# Altium PCB DC-DC_Bridge.PcbDoc
Units mm, origin at the board's own origin, x right, y up, seen from the top; angles counter-clockwise.
Board outline 75 x 80 mm, 2 copper layers (Top Layer, Bottom Layer), stack 0.871 mm thick; 101 components, 43 nets, 233 pads, 26 vias.
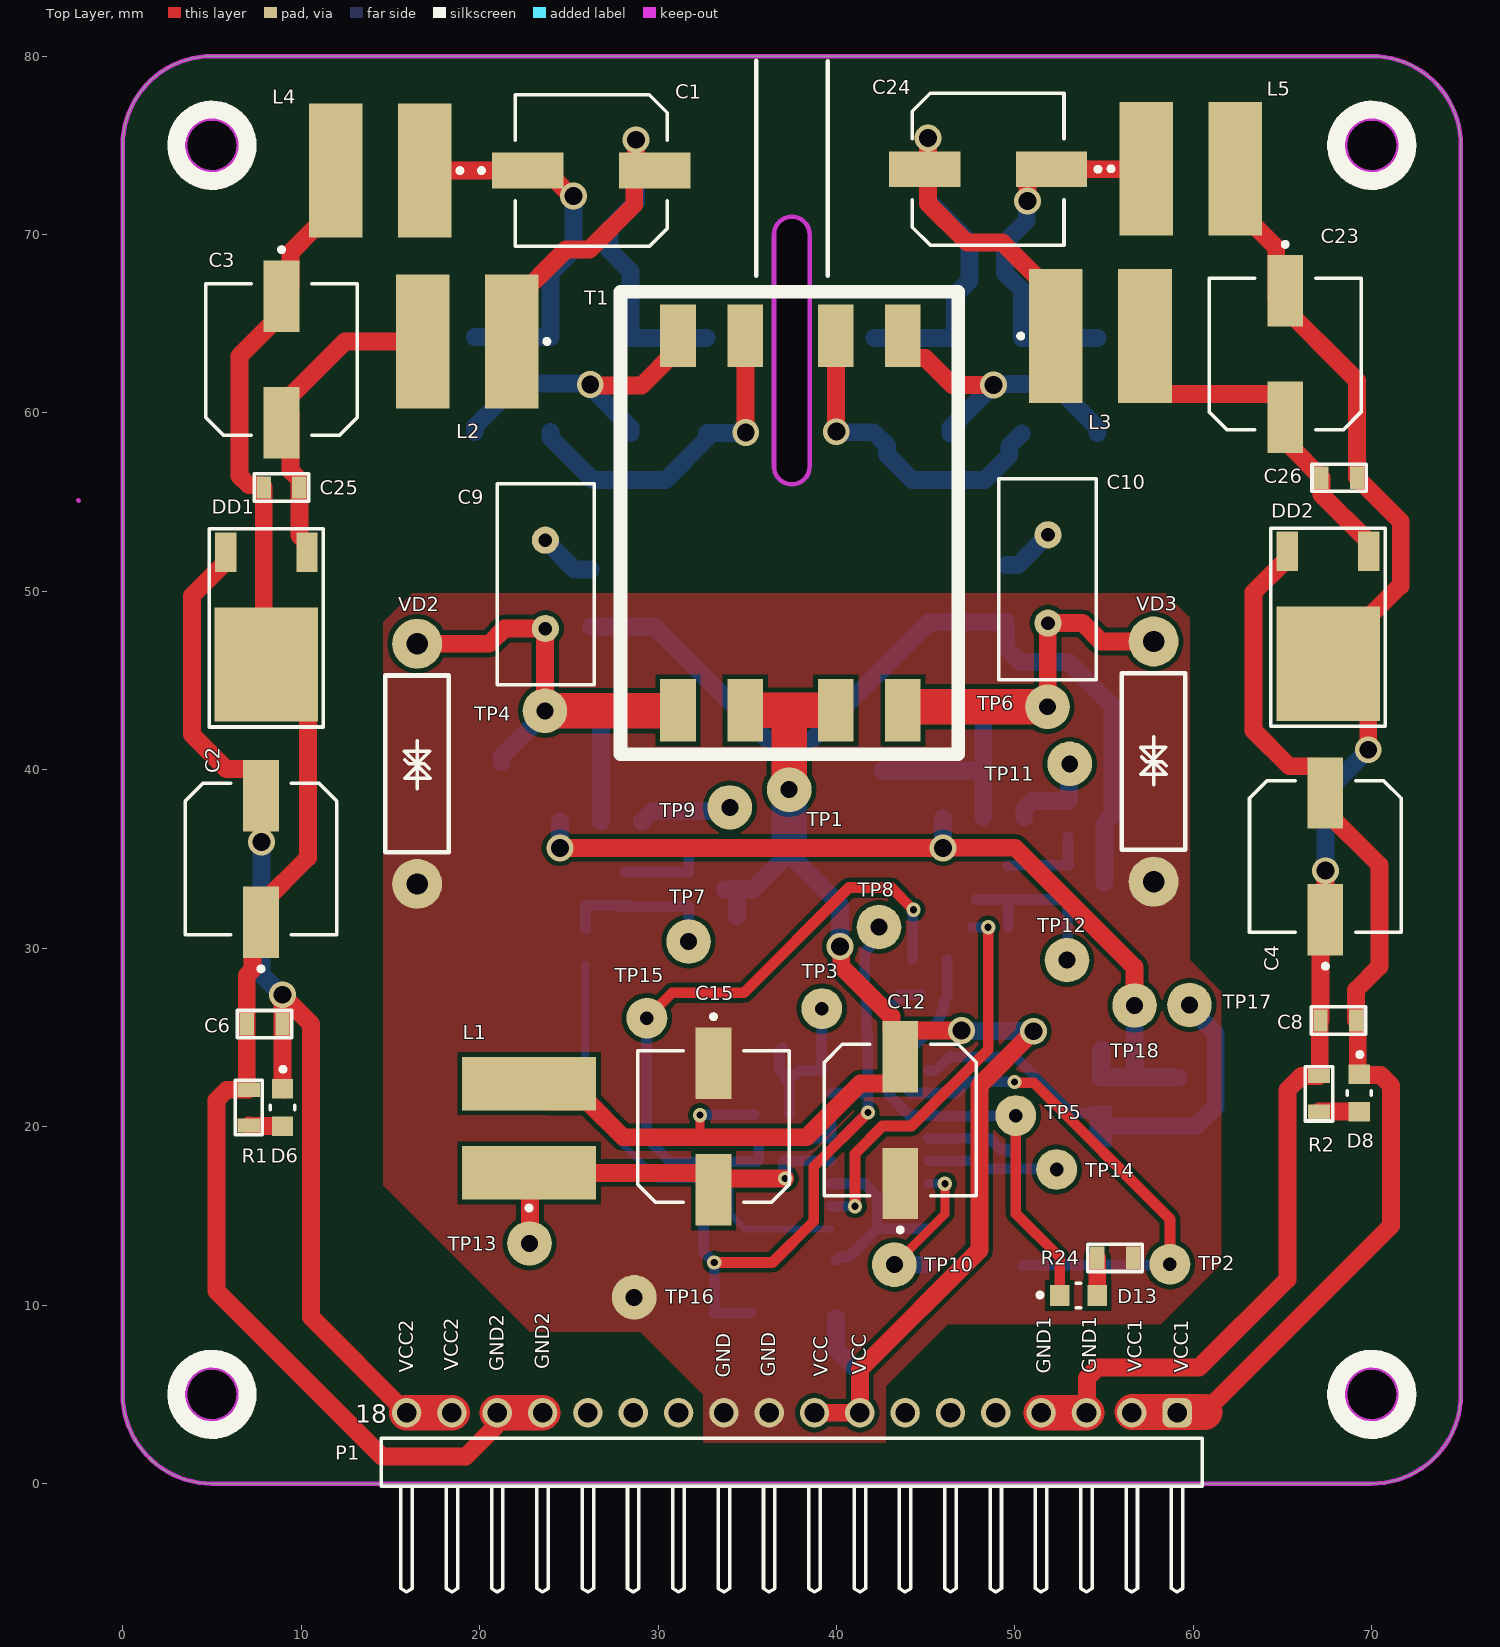
[diagram p0: Top Layer view]
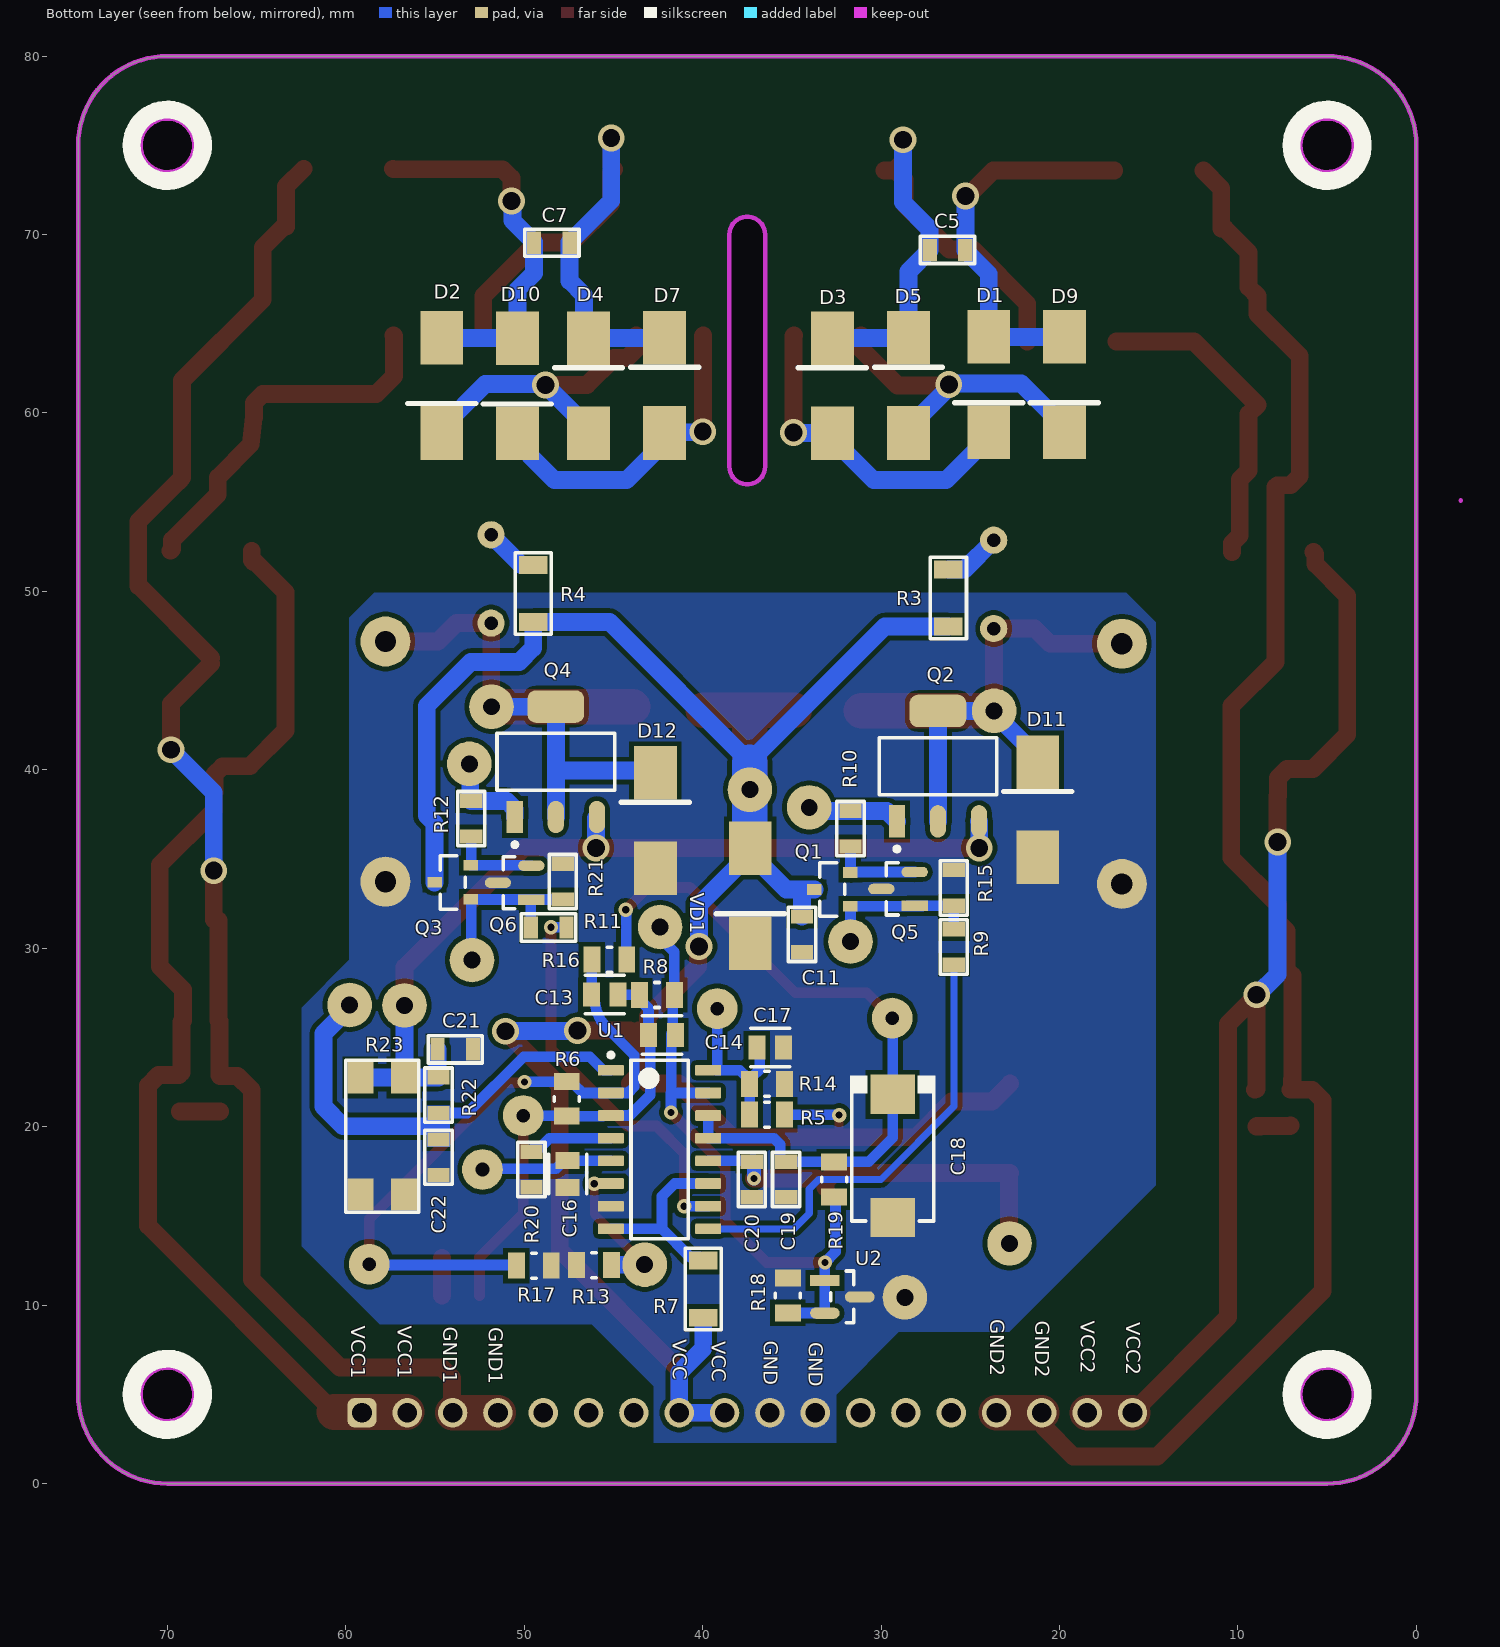
[diagram p1: Bottom Layer view, seen from below]
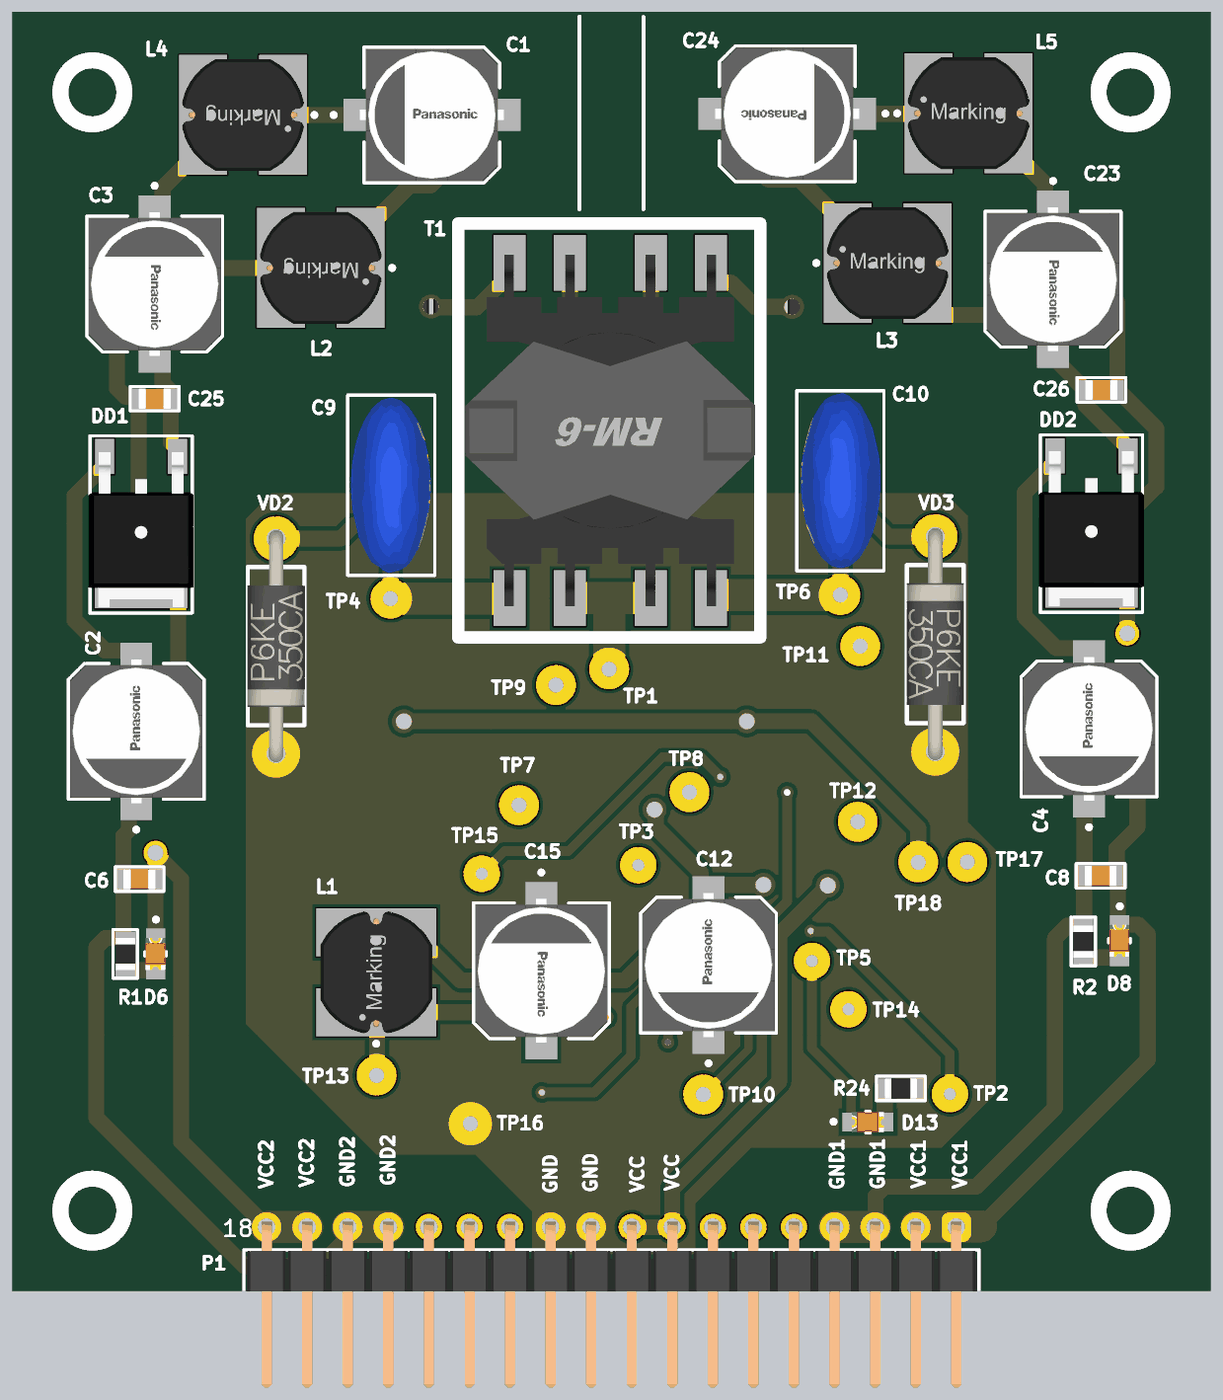
[diagram p2: 3D render of the assembled board from above, using the file's embedded part models]
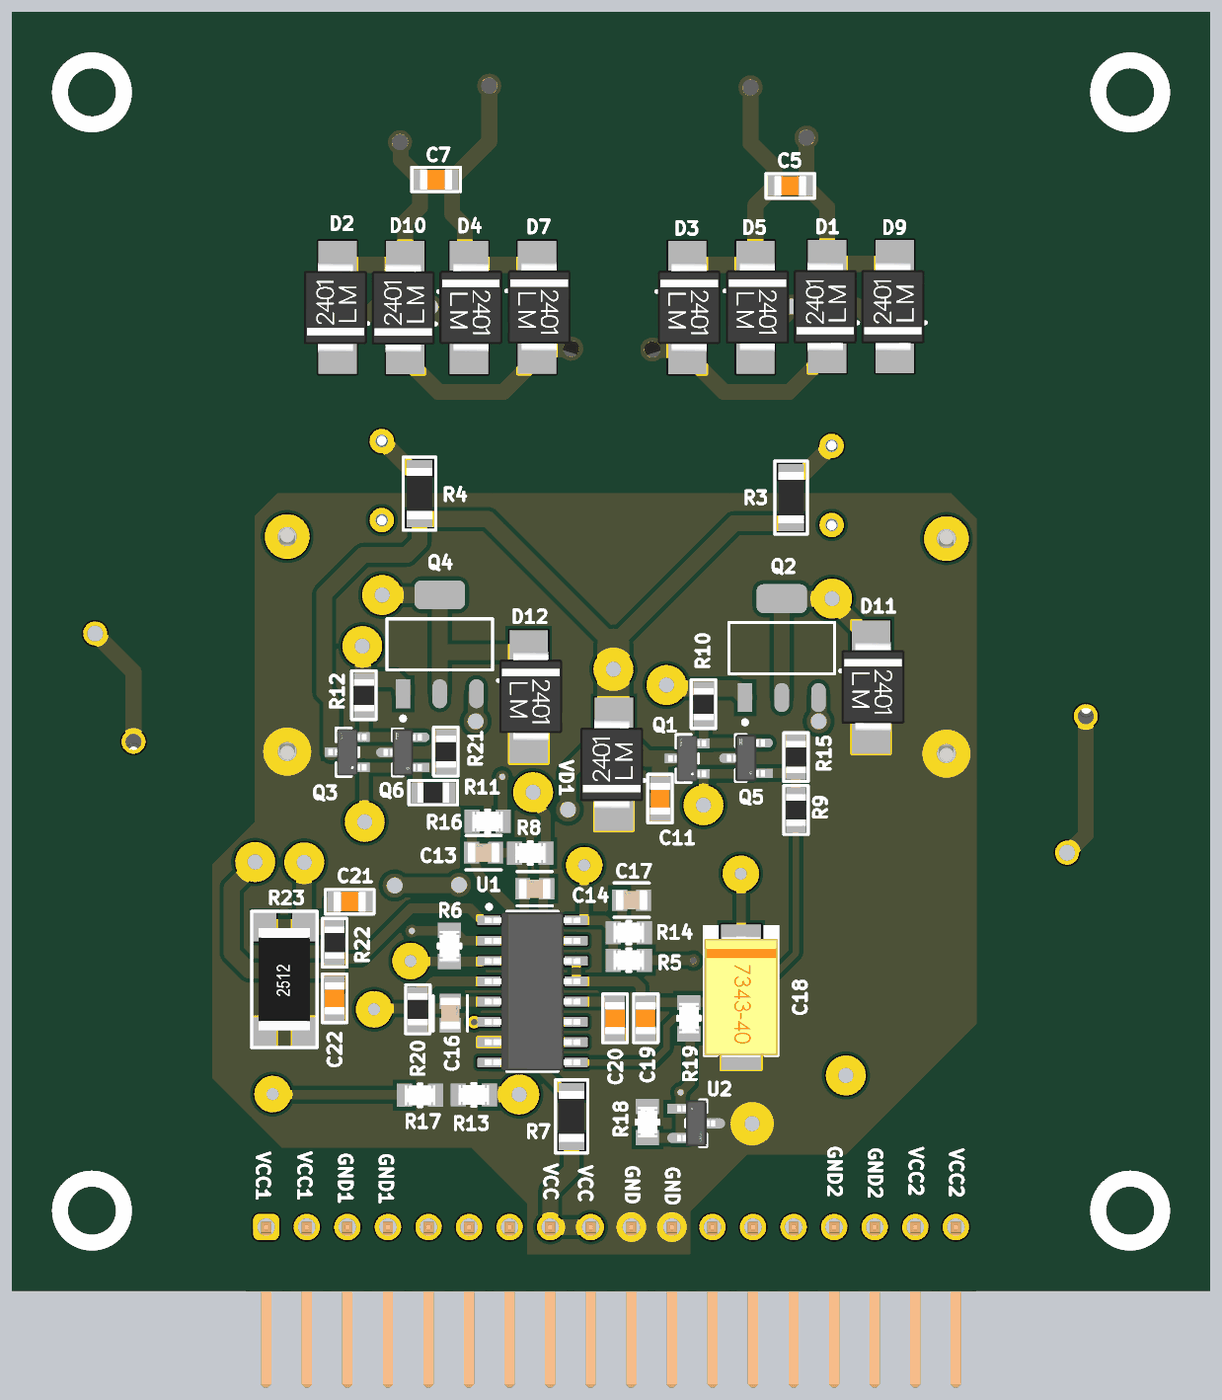
[diagram p3: 3D render of the assembled board from below, using the file's embedded part models]

## Layer stack, top to bottom
Top Solder: solder mask 0.0102, Solder Resist, Dk 3.5
Top Layer: signal copper 0.0356
Dielectric 1: dielectric 0.8, FR-4, Dk 4.8
Bottom Layer: signal copper 0.0356
Bottom Solder: solder mask 0.0102, Solder Resist, Dk 3.5

## Board outline
0,5 0,75 cw(c5,75) 5,80 70,80 cw(c70,75) 75,75 75,5 cw(c70,5) 70,0 5.025,0 5,0 cw(c5,5)
cut-out: 68.5,75 ccw(c70,75) 70,73.5 ccw(c70,75) 71.5,75 ccw(c70,75) 70,76.5 ccw(c70,75)
cut-out: 68.5,5 ccw(c70,5) 70,3.5 ccw(c70,5) 71.5,5 ccw(c70,5) 70,6.5 ccw(c70,5)
cut-out: 3.5,5 ccw(c5,5) 5,3.5 ccw(c5,5) 6.5,5 ccw(c5,5) 5,6.5 ccw(c5,5)
cut-out: 3.5,75 ccw(c5,75) 5,73.5 ccw(c5,75) 6.5,75 ccw(c5,75) 5,76.5 ccw(c5,75)
cut-out: 36.5,57 ccw(c37.5,57) 38.5,57 38.5,70 ccw(c37.5,70) 36.5,70

## Design rules (kind name [scope] priority, off if disabled: settings)
Clearance [All] p1: gap=0.254 ignorepadtopadclearanceinfootprint=FALSE except(0: Arc-Hole Track-Hole SMDPad-Hole THPad-Hole Via-Hole Fill-Hole Poly-Hole Region-Hole Text-Hole)
Height [All] p1: minheight=0 maxheight=101.6 prefheight=12.7
PlaneConnect [All] p1: planeconnectstyle=Direct reliefexpansion=0.508 reliefentries=4 reliefconductorwidth=0.254 reliefairgap=0.254
PolygonConnect [All] p1: connectstyle=Direct reliefconductorwidth=0.254 reliefentries=4 polygonreliefangle="90 Angle" airgapwidth=0.254
RoutingVias [All] p1: holewidth=0.711 width=1.27 viastyle="Through Hole" minholewidth=0.2 minwidth=0.5 maxholewidth=0.711 maxwidth=1.27
SolderMaskExpansion [All] p1: expansion=0.102 istentingtop=FALSE
Width [All] p1: maxlimit=3 minlimit=0.254 preferedwidth=1 minimp=50.000000 maximp=50.000000 favimp=50.000000
28 further rules are at their usual default settings.

## Components (designator, comment, footprint, x,y, rotation, side; value= is the part's Value field where it differs from the comment)
C1 "CAP-POLAR" CAP_SMD_Size_G 26.259,73.584 r0 top
C2 "CAP-POLAR" CAP_SMD_Size_G 7.75,35 r90 top
C3 "CAP-POLAR" CAP_SMD_Size_G 8.9,63 r270 top
C4 "CAP-POLAR" CAP_SMD_Size_G 67.4,35.15 r90 top
C5 "CAP-NON-POLAR" CAP-0805 26.278,69.139 r0 bottom
C6 "CAP-NON-POLAR" CAP-0805 7.95,25.75 r0 top
C7 "CAP-NON-POLAR" CAP-0805 48.452,69.545 r180 bottom
C8 "CAP-NON-POLAR" CAP-0805 68.125,25.95 r0 top
C9 "CAP-V" CAP-V 23.687,50.394 r270 top locked
C10 "CAP-V" CAP-V 51.856,50.698 r90 top locked
C11 "0.01uF" CAP-0805 34.432,30.785 r90 bottom
C12 "470uF_25V" CAP_SMD_Size_G 43.576,20.371 r90 top
C13 "100nF" FP-C0805C-DN-MFG 45.481,27.407 r180 bottom value="10,000 pF"
C14 "100nF" FP-C0805C-DN-MFG 42.28,25.146 r180 bottom value="10,000 pF"
C15 "470uF_25V" CAP_SMD_Size_G 33.111,20.015 r270 top
C16 "C0805C102K5RACTU" FP-C0805C-DN-MFG 47.563,17.348 r270 bottom value="1,000 pF"
C17 "100nF" FP-C0805C-DN-MFG 36.21,24.435 r180 bottom value="10,000 pF"
C18 "100uF" CAP-TAN-D 29.352,18.364 r270 bottom
C19 "0.1uF" CAP-0805 35.321,17.043 r90 bottom
C20 "0.01uF" CAP-0805 37.251,17.043 r90 bottom
C21 "0.47uF" CAP-0805 53.863,24.333 r0 bottom
C22 "470 pF" CAP-0805 54.802,18.288 r90 bottom
C23 "CAP-POLAR" CAP_SMD_Size_G 65.15,63.3 r270 top
C24 "CAP-POLAR" CAP_SMD_Size_G 48.503,73.66 r180 top
C25 "CAP-NON-POLAR" CAP-0805 8.9,55.825 r0 top
C26 "CAP-NON-POLAR" CAP-0805 68.175,56.375 r180 top
D1 "US1G" DO-214AA 23.967,59.309 r90 bottom
D2 "US1G" DO-214AA 54.625,59.258 r90 bottom
D3 "US1G" DO-214AA 32.73,63.805 r270 bottom
D4 "US1G" DO-214AA 46.395,63.805 r270 bottom
D5 "US1G" DO-214AA 28.463,63.83 r270 bottom
D6 "151031YS06000" LED_RED 8.955,21.069 r270 top
D7 "US1G" DO-214AA 42.128,63.83 r270 bottom
D8 "151031YS06000" LED_RED 69.305,21.895 r270 top
D9 "US1G" DO-214AA 19.725,59.309 r90 bottom
D10 "US1G" DO-214AA 50.383,59.233 r90 bottom
D11 "US1G" DO-214AA 21.224,40.056 r270 bottom
D12 "US1G" DO-214AA 42.65,39.45 r270 bottom
D13 "151031YS06000" LED_RED 53.558,10.541 r0 top
DD1 "LM7818" TO-252 8.05,48 r180 top
DD2 "LM7818" TO-252 67.55,48.05 r180 top locked
L1 "390µH, 0.38A" WE-PD2_7850 22.773,19.914 r90 top
L2 "390µH, 0.38A" WE-PD2_7850 19.304,64.008 r180 top
L3 "390µH, 0.38A" WE-PD2_7850 54.792,64.313 r0 top
L4 "390µH, 0.38A" WE-PD2_7850 14.431,73.584 r180 top
L5 "390µH, 0.38A" WE-PD2_7850 59.857,73.685 r0 top
P1 "61301811021" 61301811021 37.5,1.2 r0 top locked
Q1 "SS8050-G" FP-SS8050-G-MFG 32.73,33.299 r0 bottom
Q2 "IRFL024NTRPBF" FP-PG-SOT223-3-IPC_B 26.812,40.208 r90 bottom
Q3 "SS8050-G" FP-SS8050-G-MFG 54.009,33.696 r0 bottom
Q4 "IRFL024NTRPBF" FP-PG-SOT223-3-IPC_B 48.225,40.45 r90 bottom
Q5 "MMSS8550-H-TP" FP-SOT-23-IPC_B 29.051,33.325 r0 bottom
Q6 "MMSS8550-H-TP" FP-SOT-23-IPC_B 50.535,33.68 r0 bottom
R1 "10K" RES-0805 7.06,21.069 r270 top
R2 "10K" RES-0805 67.044,21.845 r270 top
R3 "10 OMH" RES-1206 26.227,49.632 r90 bottom
R4 "10 OMH" RES-1206 49.494,49.886 r270 bottom
R5 "10K" FP-CRCW0805-e3-MFG 36.387,20.676 r0 bottom
R6 "200K" FP-CRCW0805-e3-MFG 47.614,21.565 r270 bottom
R7 "10 OMH" RES-1206 39.969,10.897 r270 bottom
R8 "200K" FP-CRCW0805-e3-MFG 42.56,27.381 r180 bottom
R9 "470" RES-0805 25.923,30.074 r270 bottom
R10 "10" RES-0805 31.714,36.703 r90 bottom
R11 "470" RES-0805 48.63,31.166 r180 bottom
R12 "10" RES-0805 52.974,37.262 r90 bottom
R13 "15K" FP-CRCW0805-e3-MFG 46.09,12.243 r0 bottom
R14 "1.2K" FP-CRCW0805-e3-MFG 36.387,22.403 r180 bottom
R15 "2K" RES-0805 25.923,33.385 r270 bottom
R16 "2K" FP-CRCW0805-e3-MFG 45.227,29.362 r180 bottom
R17 "2K" FP-CRCW0805-e3-MFG 49.459,12.217 r180 bottom
R18 "2K" FP-CRCW0805-e3-MFG 35.219,10.541 r90 bottom
R19 "2K" FP-CRCW0805-e3-MFG 32.628,17.043 r90 bottom
R20 "10K" RES-0805 49.595,17.602 r90 bottom
R21 "2K" RES-0805 47.843,33.731 r270 bottom
R22 "1K" RES-0805 54.802,21.768 r90 bottom
R23 "10 OMH" RES-2512 57.952,19.482 r90 bottom
R24 "220" RES-0805 55.615,12.649 r180 top
T1 "RM-6" TRANS_RM6 37.424,53.835 r90 top locked
TP1 "" Test_Point#1 37.353,38.887 r0 top
TP2 "Test_Point_PCB" Test_Point#2 58.689,12.294 r0 top
TP3 "Test_Point_PCB" Test_Point#2 39.181,26.619 r0 top
TP4 "" Test_Point#1 23.662,43.307 r0 top
TP5 "Test_Point_PCB" Test_Point#2 50.053,20.625 r0 top
TP6 "" Test_Point#1 51.831,43.536 r0 top
TP7 "" Test_Point#1 31.714,30.378 r0 top
TP8 "" Test_Point#1 42.382,31.191 r0 top
TP9 "" Test_Point#1 34.025,37.897 r0 top
TP10 "" Test_Point#1 43.245,12.268 r90 top
TP11 "" Test_Point#1 53.075,40.335 r90 top
TP12 "" Test_Point#1 52.923,29.337 r90 top
TP13 "" Test_Point#1 22.798,13.462 r90 top
TP14 "Test_Point_PCB" Test_Point#2 52.339,17.602 r90 top
TP15 "Test_Point_PCB" Test_Point#2 29.377,26.086 r90 top
TP16 "" Test_Point#1 28.666,10.439 r90 top
TP17 "" Test_Point#1 59.781,26.822 r90 top
TP18 "" Test_Point#1 56.707,26.797 r90 top
U1 "TL494CDR" D0016A_N 42.414,18.72 r180 bottom locked
U2 "TL431" TL431_SOT-23-3(A) 32.171,10.465 r180 bottom
VD1 "Suppressor" DO-214AA 37.327,30.658 r90 bottom
VD2 "Suppressor" P6KE350CA 16.5,40.335 r90 top
VD3 "Suppressor" P6KE350CA 57.774,40.462 r270 top

## Footprints (in the part's own frame and the unit in brackets; to place one, negate y for a bottom-side part, rotate by r counter-clockwise, add the part's x,y. Pads: shape width x height; smd on the part's side, far side on the other; paste and mask are expansions set on the pad)
61301811021 [mm] "Pin Header, pitch 2.54 mm, THT, Angled, single row, 18p"
  rrect50% 1.65x1.65 hole 1.1: 1(21.59,2.77)
  round 1.65 hole 1.1: 2(19.05,2.77) 3(16.51,2.77) 4(13.97,2.77) 5(11.43,2.77) 6(8.89,2.77) 7(6.35,2.77) 8(3.81,2.77) 9(1.27,2.77) 10(-1.27,2.77) 11(-3.81,2.77) 12(-6.35,2.77) 13(-8.89,2.77) 14(-11.43,2.77) 15(-13.97,2.77) 16(-16.51,2.77) 17(-19.05,2.77) 18(-21.59,2.77)
  silkscreen extent -23.01,-7.27 23.01,1.35, body extent -22.86,-7.27 22.86,3.09, height 2.58
CAP-0805 [mm]
  rect 0.8x1.25 smd mask+0.015: 1(-1,0) 2(1,0)
  silkscreen extent -1.52,-0.76 1.52,0.76, body extent -1,-0.62 1,0.63, height 0.8
CAP-TAN-D [mm]
  rect 2.2x2.5 smd: 1(-3.45,0) 2(3.45,0)
  silkscreen extent -4.5,-2.4 3.65,2.4, body extent -3.8,-2.3 3.8,2.3, height 4
CAP-V [mil]
  round 60 hole 30: 1(-97.44,0) 2(97.44,0)
  silkscreen extent -222,-106 221,108, body extent -216,-98 216,98, height 610
CAP_SMD_Size_G [mm]
  rect 4x2 smd paste+0 mask+0: 1(3.55,0) 2(-3.55,0)
  silkscreen extent -6.27,-4.25 4.25,4.25, body extent -5.8,-4.5 5.8,4.5, height 0.25
D0016A_N [mm] "SOIC, 16-Leads, Body 10x4mm, Pitch 1.27mm, IPC Medium Density"
  rrect17% 1.45x0.6 smd: 1(-2.725,4.445) 2(-2.725,3.175) 3(-2.725,1.905) 4(-2.725,0.635) 5(-2.725,-0.635) 6(-2.725,-1.905) 7(-2.725,-3.175) 8(-2.725,-4.445) 9(2.725,-4.445) 10(2.725,-3.175) 11(2.725,-1.905) 12(2.725,-0.635) 13(2.725,0.635) 14(2.725,1.905) 15(2.725,3.175) 16(2.725,4.445)
  silkscreen extent -2.85,-5 1.6,5.42, body extent -3,-4.95 3,4.95, height 1.59
DO-214AA [mm]
  rect 3x2.4 smd: 1(-0.381,0) 2(4.953,0)
  silkscreen extent 1.27,-1.91 1.27,1.91, body extent -0.53,-1.85 5.07,2.1, height 2.65
FP-C0805C-DN-MFG [mm]
  rect 0.95x1.35 smd paste+0 mask+0: 1(-0.75,0) 2(0.75,0)
  silkscreen extent -1.1,-1.07 1.1,1.07, body extent -1,-0.63 1,0.63, height 0.88
FP-CRCW0805-e3-MFG [mm]
  rect 0.95x1.45 smd paste+0 mask+0: 1(-0.975,0) 2(0.975,0)
  silkscreen extent -0.13,-0.7 0.13,0.7, body extent -1,-0.63 1,0.63, height 0.5
FP-PG-SOT223-3-IPC_B [mm]
  rect 1.814x0.913 smd paste+0 mask+0: 1(-3.095,2.3)
  rrect100% 1.814x0.913 smd paste+0 mask+0: 2(-3.095,0) 3(-3.095,-2.3)
  rrect50% 1.814x3.172 smd paste+0 mask+0: 4(3.095,0)
  silkscreen extent -4.77,-3.3 1.6,3.3
FP-SOT-23-IPC_B [mm]
  rect 1.474x0.585 smd paste+0 mask+0: 1(-0.935,0.95)
  rrect100% 1.474x0.585 smd paste+0 mask+0: 2(-0.935,-0.95) 3(0.935,0)
  silkscreen extent 0,-1.46 0.65,1.46, body extent -1.2,-1.46 1.2,1.46, height 1.25
FP-SS8050-G-MFG [mm]
  rect 0.8x0.6 smd paste+0 mask+0: 1(-1.01,0.95) 2(-1.01,-0.95) 3(1.01,0)
  silkscreen extent -0.7,-1.5 0.7,1.5, body extent -1.21,-1.45 1.21,1.45, height 1.15
LED_RED [mm]
  rect 1.1x1.2 smd paste+0 mask+0: 1(-1.05,0) 2(1.05,0)
  silkscreen extent -2.27,-0.67 0.13,0.67, body extent -1,-0.63 1,0.63, height 0.8
P6KE350CA [mm]
  round 2.8 hole 1.2: 1(-6.731,0) 2(6.731,0)
  silkscreen extent -4.95,-1.78 4.95,1.78, body extent -7.26,-1.8 7.26,1.8, height 6.9
RES-0805 [mm]
  rect 0.8x1.25 smd mask+0.015: 1(-1,0) 2(1,0)
  silkscreen extent -1.52,-0.76 1.52,0.76, body extent -1,-0.62 1,0.63, height 0.6
RES-1206 [mm]
  rect 1x1.6 smd: 1(-1.6,0) 2(1.6,0)
  silkscreen extent -2.29,-1.02 2.29,1.02, body extent -1.6,-0.8 1.6,0.8, height 0.6
RES-2512 [mm]
  rect 1.8x1.45 smd: 1(-3.275,-1.225) 1(-3.275,1.225) 2(3.275,-1.225) 2(3.275,1.225)
  silkscreen extent -4.28,-2.05 4.25,2.05, body extent -3.2,-1.6 3.2,1.6, height 0.6
Test_Point#1 [mm]
  round 2.5 hole 0.95: 1(0,0)
Test_Point#2 [mm]
  round 2.286 hole 0.762 paste-2539.97 mask+0.102: 1(0,0)
TL431_SOT-23-3(A) [mm]
  rect 1.659x0.627 smd paste+0 mask+0: 1(-0.977,0.915)
  rrect100% 1.659x0.627 smd paste+0 mask+0: 2(-0.977,-0.915) 3(0.977,0)
  silkscreen extent -0.65,-1.45 0.65,1.45, body extent -1.2,-1.45 1.2,1.45, height 1.1
TO-252 [mm]
  rect 1.2x2.2 smd: 1(-2.28,-4.2) 3(2.28,-4.2)
  rect 5.8x6.4 smd: 2(0,2.1)
  silkscreen extent -3.2,-5.5 3.2,5.6, body extent -3.29,-4.47 3.29,5.23, height 2.3
TRANS_RM6 [mm]
  rect 3.5x2 smd: 1(-10.5,6.3) 2(-10.5,2.54) 3(-10.5,-2.54) 4(-10.5,-6.3) 5(10.5,-6.3) 6(10.5,-2.54) 7(10.5,2.54) 8(10.5,6.3)
  silkscreen extent -12.95,-9.4 12.95,9.53, body extent -11,-9.08 11,9.08, height 12.68
WE-PD2_7850 [mm] "SMD Power Inductor, 2-Leads, body 7.8x7mm"
  rect 3x7.5 smd: 1(-2.5,0) 2(2.5,0)
  silkscreen extent -4.59,-0.13 -4.34,0.12, body extent -3.81,-3.5 3.81,3.5, height 4.95

## Part data
C11 C19 C20 C21 C22: library part CAP-NON-POLAR
C12 C15 C18: library part CAP-POLAR
C13 C14 C17: library part CMP-2007-00254-2, "CAP CER 10000PF 50V X7R 0805", Capacitance="10,000 pF", Manufacturer=KEMET, Manufacturer Part Number=C0805C103J5RACTU, Package=C0805C-DN, Temperature="-55°C to +125°C", Temperature Characteristic=X7R, Temperature Coefficient=30ppm/°C, Temperature Range High=+125°C, Temperature Range Low=-55°C, Tolerance=0.05, Voltage Rating="50 V", Automotive=No, Category=Cap, ComponentLink2Description=Datasheet, ComponentLink2URL=https://content.kemet.com/datasheets/KEM_C1003_C0G_SMD.pdf, Device Class L1="Passive Components", Device Class L2=Capacitors, Device Class L3="Ceramic Capacitors", Digikey Description="CAP CER 10000PF 50V X7R 0805", Height=0.88mm, Ipc Land Pattern Name=CAPC200125X78, Lead Free=Yes, Material=Ceramic, Mouser Description="Capacitor; Ceramic; Cap 0.01uF; Tol 5%; Vol-Rtg 50 V; SMT; Case 0805; X7R; TR", Octopart=https://octopart.com/c0805c103j5ractu-kemet-133473, RoHS=TRUE
C16: library part CMP-2007-01097-2, "CAP CER 1000PF 50V X7R 0805", Capacitance="1,000 pF", Manufacturer=KEMET, Package=C0805C-DN, Temperature="-55°C to +125°C", Temperature Characteristic=X7R, Temperature Coefficient=30ppm/°C, Temperature Range High=+125°C, Temperature Range Low=-55°C, Tolerance=0.1, Voltage Rating="50 V", Automotive=No, Category=Cap, ComponentLink2Description=Datasheet, ComponentLink2URL=https://content.kemet.com/datasheets/KEM_C1003_C0G_SMD.pdf, Device Class L1="Passive Components", Device Class L2=Capacitors, Device Class L3="Ceramic Capacitors", Digikey Description="CAP CER 1000PF 50V X7R 0805", Height=0.88mm, Ipc Land Pattern Name=CAPC200125X78, Lead Free=Yes, Manufacturer Part Number=C0805C102K5RACTU, Material=Ceramic, Mouser Description="Cap Ceramic 0.001uF 50V X7R 10% SMD 0805 125C Plastic T/R", Octopart=https://octopart.com/c0805c102k5ractu-kemet-93010, RoHS=TRUE
D6 D8 D13: library part LED, "WURTH ELEKTRONIK - 151031YS06000 - LED, Yellow, Through Hole, T-1 (3mm), 30 mA, 2 V, 590 nm", Manufacturer_Name="Wurth Elektronik", Mouser Part Number=710-151031YS06000, Datasheet Link=https://katalog.we-online.de/led/datasheet/151031YS06000.pdf, Geometry.Height=5.5mm, Manufacturer_Part_Number=151031YS06000, Mouser Price/Stock=https://www.mouser.co.uk/ProductDetail/Wurth-Elektronik/151031YS06000?qs=LlUlMxKIyB3xSYYW%252BcuBiQ%3D%3D
L1 L2 L3 L4 L5: library part 744775239, "WE-PD2 SMT Power Inductor, size 7850, 390µH, 0.38A, 1.77Ω", Case/Size Code=7850, DC Resistance=1.151Ω, DC Resistance Max=1.77Ω, Inductance=390µH, Manufacturer="Wurth Elektronik", Operating Temperature Max=125°C, Operating Temperature Min=-40°C, Rated Current=0.38A, Saturation Current=0.43A, Self Resonant Frequency=3.9MHz, Category="Unshielded Power Inductors", ComponentLink1Description="Website Link", ComponentLink1URL=https://www.we-online.com/redexpert/article/744775239?ad, ComponentLink2Description="Datasheet Link", ComponentLink2URL=https://www.we-online.com/redexpert/spec/744775239?ad, Height=4.95mm, Length=7.8mm, Manufacturer Part Number=744775239, Match Code=WE-PD2, Mount="Surface Mount", Packaging="Tape and Reel", Width=7mm, Simulation ModelName=7850_744775239_390u, Simulation ModelText=".subckt 7850_744775239_390u 1 2 / Rp 1 2 180000 / Cp 1 2 5p / Rs 1 N3 1.151 / L1 N3 2 390u / .ends 7850_744775239_390u", Simulation PortMap=(1:1),(2:2)
P1: "WR-PHD Pin Header, THT, Angled, pitch 2.54mm, 1 Row, 18P", Contact Resistance=20mΩ, Manufacturer="Wurth Elektronik", Operating Temperature Max=105°C, Operating Temperature Min=-40°C, Rated Current=3A, Withstanding Voltage=500V, Working Voltage=250V, Category="Board-to-Board Connectors", ComponentLink1Description="Website Link", ComponentLink1URL=https://www.we-online.com/redexpert/article/61301811021?ad, ComponentLink2Description="Datasheet Link", ComponentLink2URL=https://www.we-online.com/redexpert/spec/61301811021?ad, Gender="Pin Header", Manufacturer Part Number=61301811021, Match Code=WR-PHD, Mount="Through Hole", Number of Pins=18, Number of Rows=1, Orientation=Angled, Packaging=Bag, Pitch=2.54mm
Q1 Q3: library part CMP-20235-000001-1, "NPN TRANSISTOR 1.5A 40V SOT-23 R", Case/Package=TO-236-3, Collector Emitter Breakdown Voltage=25V, Collector Emitter Voltage (VCEO)=400mV, Max Collector Current=1.5A, Max Power Dissipation=300mW, Transition Frequency=100MHz, Max Breakdown Voltage=25V, Mount="Surface Mount", Packaging="Tape and Reel", RoHS Compliant=Yes
Q2 Q4: library part CMP-32901-001217-1, "MOSFET N-CH 55V 2.8A SOT223", Case/Package=SOT-223, Continuous Drain Current (ID)=2.8A, Drain to Source Breakdown Voltage=55V, Drain to Source Resistance=75mR, Gate to Source Voltage (Vgs)=20V, Input Capacitance=400pF, Max Operating Temperature=150°C, Max Power Dissipation=1W, Min Operating Temperature=-55°C, Power Dissipation=2.1W, Threshold Voltage=4V, Drain to Source Voltage (Vdss)=55V, Halogen Free="Halogen Free", Height=0.057inch, Lead Free="Contains Lead", Length=0.263inch, Max Dual Supply Voltage=55V, Mount="Surface Mount", Number of Pins=3, Packaging="Cut Tape", Polarization=N, Rds On Max=75mR, Reach SVHC Compliant=Yes, RoHS Compliant=Yes, Series=HEXFET®, Turn-Off Delay Time=22.2ns, Turn-On Delay Time=8.1ns, Width=0.146inch
Q5 Q6: library part CMP-56214-000002-1, "TRANS PNP 25V 1.5A SOT23", Case/Package=SOT-23, Collector Base Voltage (VCBO)=40V, Collector Emitter Breakdown Voltage=25V, Collector Emitter Saturation Voltage=500mV, Emitter Base Voltage (VEBO)=1.6V, Max Collector Current=1.5A, Max Operating Temperature=150°C, Max Power Dissipation=625mW, Min Operating Temperature=-55°C, Package Quantity=1, Transition Frequency=100MHz, Collector Emitter Voltage (VCEO)=500mV, Element Configuration=Single, Gain Bandwidth Product=100MHz, hFE Min=40, Lead Free="Lead Free", Max Breakdown Voltage=25V, Mount="Surface Mount", Packaging="Tape and Reel", Polarity=PNP
R1 R2 R3 R4 R7 R9 R10 R11 R12 R15 R20 R21 R22 R23 R24: library part RES-CONST
R5 R6 R8 R14 R16 R18 R19: library part CMP-2001-04908-2, "RES Thick Film, 2kΩ, 1%, 0.125W, 100ppm/°C, 0805", Case Code (Imperial)=0805, Case Code (Metric)=2012, Max Operating Temperature=155°C, Min Operating Temperature=-55°C, Package Quantity=5000, Power Rating=125mW, Resistance=10kR, Temperature Coefficient=100ppm/°C, Tolerance=1%, Voltage Rating=150V, Case/Package=0805, Composition="Thick Film", Contact Plating=Tin, Depth=1.25mm, Height=0.45mm, Lead Free="Lead Free", Length=2mm, Military Standard=Not, Packaging="Tape and Reel", Radiation Hardening=No, Termination=SMD/SMT, Voltage Rating (DC)=150V, Weight=0.000194oz, Width=1.25mm
R13: library part CMP-2001-04908-2, "RES Thick Film, 15kΩ, 1%, 0.125W, 100ppm/°C, 0805", Case Code (Imperial)=0805, Case Code (Metric)=2012, Max Operating Temperature=155°C, Min Operating Temperature=-55°C, Package Quantity=5000, Power Rating=125mW, Resistance=10kR, Temperature Coefficient=100ppm/°C, Tolerance=1%, Voltage Rating=150V, Case/Package=0805, Composition="Thick Film", Contact Plating=Tin, Depth=1.25mm, Height=0.45mm, Lead Free="Lead Free", Length=2mm, Military Standard=Not, Packaging="Tape and Reel", Radiation Hardening=No, Termination=SMD/SMT, Voltage Rating (DC)=150V, Weight=0.000194oz, Width=1.25mm
R17: library part CMP-2001-04908-2, "RES Thick Film, 82kΩ, 1%, 0.125W, 100ppm/°C, 0805", Case Code (Imperial)=0805, Case Code (Metric)=2012, Max Operating Temperature=155°C, Min Operating Temperature=-55°C, Package Quantity=5000, Power Rating=125mW, Resistance=10kR, Temperature Coefficient=100ppm/°C, Tolerance=1%, Voltage Rating=150V, Case/Package=0805, Composition="Thick Film", Contact Plating=Tin, Depth=1.25mm, Height=0.45mm, Lead Free="Lead Free", Length=2mm, Military Standard=Not, Packaging="Tape and Reel", Radiation Hardening=No, Termination=SMD/SMT, Voltage Rating (DC)=150V, Weight=0.000194oz, Width=1.25mm
T1: library part RM_6_12-12-18-18
TP1 TP2 TP3 TP4 TP5 TP6 TP7 TP8 TP9 TP10 TP11 TP12 TP13 TP14 TP15 TP16 TP17 TP18: library part TP_PCB?, "Test_Point"
U1: library part CMP-0319-00950-2, "Pulse-Width-Modulation Control Circuit with Voltage Control, 45 % Duty Cycle, 0 to +70 degC, 16-pin SOIC (D), Green (RoHS & no Sb/Br)", Frequency(Max)(kHz)=300, Manufacturer="Texas Instruments", Rating=Military, Code_JEDEC=MS-012AC, ComponentLink1Description=Datasheet, ComponentLink1URL=http://www.ti.com/general/docs/lit/getliterature.tsp?genericPartNumber=TL494&fileType=pdf, Control Method=Voltage, DatasheetVersion=SLVS074E, Duty Cycle(Max)(%)=45, Eco-Plan="Green (RoHS & no Sb/Br)", Mounting Technology="Surface Mount", PackageDescription="16-Pin Plastic Small Outline Integrated Circuit, 9.9 x 3.9 mm, Pitch 1.27 mm Pitch", PackageReference=D0016A, PackageVersion="revM, Jun-2011", PartNumber=TL494CDR, Regulated Outputs(#)=2, SubFamily="PWM Controller", Topology="Boost, Buck, Flyback, Forward, Full-Bridge, Half-Bridge, Push-Pull"
U2: library part TL431_SOT-23-3, "TL431_SOT-23-3"

## Via types
v1: diameter 1.5, hole 1, Top Layer to Bottom Layer, tented both sides, 13 vias
v2: diameter 0.8, hole 0.4, Top Layer to Bottom Layer, tented both sides, 8 vias
v3: diameter 1.5, hole 1, Top Layer to Bottom Layer, 4 vias
v4: diameter 0.8, hole 0.4, Top Layer to Bottom Layer, 1 vias

## Nets (pads, with @x,y where several pads share a name; then routed paths per layer and width w, separated by ;. In a path a pad name is that pad's centre, name@x,y a point inside that pad or via, vN(x,y) a via of type N, cw(c..) or ccw(c..) an arc to the next point about the centre after c; other vN are vias at no path point)
GND: C11.1 C12.2 C15.2 C16.2 C17.2 C18.2 C19.1 C20.1 C21.1 C22.1 D11.2 D12.2 P1.10 P1.11 Q5.3 Q6.3 R13.2 R14.2 R15.1 R17.2 R18.2 R20.1 R21.1 R23.1 R24.1 TP16.1 U1.7 U2.3 VD1.1 VD2.1 VD3.2
NetC1_1: C1.1 C5.2 D3.1 D5.1 L2.1 | length 32.6
  Top Layer w1: L2.1 21.804,66.118 24.85,69.164 26.164,69.164 28.67,71.67 28.67,73.084 29.17,73.584 C1.1 ; v1(28.767,75.311) 28.767,74.084 29.267,73.584 C1.1@29.369,73.584
  Bottom Layer w1: v1(28.767,75.311) 28.767,71.806 27.278,70.317 27.278,69.114 28.463,67.929 D5.1 28.475,64.198 32.717,64.198 D3.1
NetC1_2: C1.2 C5.1 D1.2 D9.2 L4.1 | length 21.6
  Top Layer w1: L4.1 C1.2 23.709,73.584 25.08,72.213 25.211,72.213 v1(25.262,72.161)
  Bottom Layer w1: D9.2 D1.2 23.967,67.802 25.278,69.114 C5.1 25.27,69.147 25.27,72.153 v1(25.262,72.161)
NetC2_1: C2.1 C6.2 D6.1 DD1.3 P1.17 P1.18 | length 62.6
  Top Layer w1: DD1.3 5.67,52.1 5.67,51.545 3.875,49.75 3.875,41.975 5.8,40.05 7.25,40.05 7.75,39.55 C2.1 7.775,38.525 v3(7.775,35.95) ; v3(8.95,27.4) C6.2 8.95,22.169 9,22.119 9.005,22.119 D6.1@9.055,22.069 ; D6.1 D6.1@8.965,22.129 ; v3@9.037,27.263 10.55,25.75 10.55,9.33 P1.18
  Top Layer w2: P1.18 P1.17
  Bottom Layer w1: v3(7.775,35.95) 7.775,28.525 v3@8.925,27.375
NetC2_2: C2.2 C3.2 C6.1 C25.1 DD1.2 L4.2 P1.15 P1.16 R1.1 | length 93.5
  Top Layer w1: C6.1@6.95,25.625 6.95,22.639 6.961,22.628 6.961,22.169 R1.1 5.836,22.069 5.25,21.483 5.25,10.8 14.525,1.525 19.225,1.525 20.866,3.166 20.866,3.846 P1.16 ; C6.1 6.95,28.475 7.277,28.802 7.277,30.977 C2.2 7.75,32.45 10.375,35.075 10.375,43.575 7.9,46.05 C25.1 7.9,55.85 7.8,55.95 7.061,55.95 6.538,56.473 6.538,63.188 8.9,65.55 C3.2 9.4,67.05 9.4,69 10.734,70.334 10.931,70.334 10.931,72.584 L4.2
  Top Layer w2: P1.16 P1.15
NetC3_1: C3.1 C25.2 DD1.1 L2.2 | length 18.2
  Top Layer w1: DD1.1 10.33,52.7 9.9,53.13 C25.2 9.9,56.275 9.4,56.775 9.4,59.95 8.9,60.45 12.458,64.008 L2.2
NetC4_1: C4.1 C8.2 D8.1 DD2.3 P1.1 P1.2 | length 63.3
  Top Layer w1: P1.2 P1.2@56.593,4.013 ; 60.638,4.013 71.075,14.45 71.075,22.31 70.489,22.895 69.355,22.895 69.215,23.035 69.215,25.86 C8.2 69.125,27.675 70.425,28.975 70.425,34.675 67.4,37.7 C4.1 ; DD2.3@65.27,52.275 65.27,51.75 65.17,51.65 65.075,51.65 63.375,49.95 63.375,42.2 65.375,40.2 66.9,40.2 67.351,39.749 C4.1@67.351,38.749
  Top Layer w2: P1.2@56.593,4.013 59.09,4.013 60.638,4.013
NetC4_2: C4.2 C8.1 C23.2 C26.1 DD2.2 L5.2 P1.3 P1.4 R2.1 | length 88.7
  Top Layer w1: P1.3 54.037,3.997 54.037,5.914 54.623,6.5 60.325,6.5 65.269,11.444 65.269,22.053 66.061,22.845 R2.1 67.085,22.885 67.085,25.91 C8.1 ; L5.2 63.357,72.685 63.357,70.435 63.49,70.435 64.65,69.275 64.65,66.35 69.175,61.825 C26.1 69.275,56.275 69.275,56.25 69.375,56.15 69.4,56.15 71.625,53.925 71.625,50.309 ; C8.1@67.125,26.075 C4.2@67.125,31.559 ; C4.2 v3(67.4,34.35) ; DD2.2 69.8,43.7 v3(69.8,41.125) ; DD2.2@67.55,46.275 71.6,50.325
  Top Layer w2: P1.4 P1.3
  Bottom Layer w1: v3(67.4,34.35) 67.4,38.725 v3(69.8,41.125)
NetC7_1: C7.1 C24.2 D2.2 D10.2 L5.1 | length 21
  Top Layer w1: v1(50.713,71.882) 50.713,73.16 51.213,73.66 C24.2 57.332,73.66 L5.1
  Bottom Layer w1: v1(50.713,71.882) 50.661,71.83 50.661,70.779 49.452,69.57 C7.1 49.452,67.834 50.383,66.904 D10.2 50.395,64.198 54.612,64.198 D2.2
NetC7_2: C7.2 C24.1 D4.1 D7.1 L3.1 | length 32.3
  Top Layer w1: v1(45.125,75.413) 45.125,73.832 C24.1 45.129,73.484 45.129,71.746 47.33,69.545 49.309,69.545 52.292,66.563 L3.1
  Bottom Layer w1: D7.1 42.14,64.198 46.382,64.198 D4.1 46.647,64.438 46.647,66.6 47.452,67.406 C7.2 47.452,69.57 45.125,71.898 v1(45.125,75.413)
NetC9_1: C9.1 R3.2 | length 3.2
  Bottom Layer w1: C9.1 25.324,51.232 R3.2
NetC9_2: C9.2 D11.1 Q2.2 Q2.4 T1.1 TP4.1 VD2.2 | length 32.9
  Top Layer w0.6: T1.1@31.095,43.307 T1.1
  Top Layer w1: VD2.2 20.538,47.066 21.39,47.919 C9.2 23.675,47.906 23.675,43.32 TP4.1
  Top Layer w2: TP4.1 T1.1@31.095,43.307
  Bottom Layer w1: D11.1 21.224,40.737 23.662,43.175 TP4.1 23.664,43.305 26.81,43.305 Q2.4 Q2.2
NetC10_1: C10.1 D12.1 Q4.2 Q4.4 T1.4 TP6.1 VD3.1 | length 34.7
  Top Layer w0.6: T1.4 T1.4@43.924,43.536
  Top Layer w1: TP6.1 51.843,43.548 51.843,48.211 C10.1 53.798,48.223 54.828,47.193 VD3.1
  Top Layer w2: T1.4@43.924,43.536 TP6.1
  Bottom Layer w0.6: 47.995,39.954 48.148,40.107
  Bottom Layer w1: D12.1@42.585,39.954 47.995,39.954 ; Q4.4@48.149,43.534 51.829,43.534 TP6.1 ; Q4.2 Q4.4
NetC10_2: C10.2 R4.1 | length 3.1
  Bottom Layer w1: R4.1 50.168,51.486 C10.2
NetC13_1: C13.1 R6.1 R16.1 R17.1 TP2.1 U1.2 | length 37.3
  Top Layer w0.6: v2(49.976,22.504) 50.015,22.466 51.056,22.466 58.689,14.834 TP2.1
  Bottom Layer w0.6: R16.1 46.216,29.348 46.216,27.421 C13.1 46.056,27.032 46.022,26.834 cw(c43.657,27.232) 45.352,25.535 43.83,24.012 43.83,22.246 44.181,21.895 U1.2 46.725,21.895 47.189,22.359 47.189,22.365 47.364,22.54 R6.1 47.632,22.522 49.959,22.522 v2(49.976,22.504) ; R17.1 50.472,12.255 58.65,12.255 TP2.1
NetC13_2: C13.2 C14.1 D13.1 R6.2 R8.1 TP5.1 U1.3 | length 25.4
  Top Layer w0.6: TP5.1 50.053,15.138 52.508,12.683 D13.1
  Bottom Layer w0.6: C14.1 43.03,26.627 43.547,27.144 43.547,27.394 44.718,27.394 C13.2 ; C14.1@43.062,25.115 42.931,24.984 42.931,21.777 44.084,20.625 45.564,20.625 45.6,20.59 R6.2 47.632,20.607 49.679,20.607 TP5.1@49.697,20.625
NetC14_2: C14.2 R8.2 R18.1 R19.1 TP8.1 U1.15 U2.1 U2.2 | length 35.6
  Top Layer w0.6: v2(33.148,12.395) 36.413,12.395 38.724,14.707 38.724,17.755 v2(41.772,20.803)
  Bottom Layer w0.6: R19.1@32.552,16.068 32.552,12.991 v2(33.148,12.395) U2.1 U2.2 33.153,9.555 35.208,9.555 R18.1 ; U1.15 41.759,21.895 41.759,25.197 41.672,25.284 41.672,27.294 R8.2 41.585,29.788 42.687,30.89 TP8.1@42.687,31.09 ; v2(41.772,20.803) 41.772,21.895
NetC15_1: C15.1 C20.2 L1.1 TP13.1 U1.12 | length 22.9
  Top Layer w0.5: C15.1 33.111,16.598 C15.1@33.61,17.097
  Top Layer w1: L1.1 32.611,17.414 33.111,16.914 C15.1@33.111,16.598 ; TP13.1@22.824,13.132 L1.1@22.824,17.363 ; C15.1@33.61,17.097 v2(37.124,17.097)
  Bottom Layer w0.6: C20.2@37.327,18.085 U1.12
  Bottom Layer w0.8: v2(37.124,17.097) 37.124,18.043 C20.2
NetC16_1: C16.1 TP14.1 U1.5 | length 7.3
  Bottom Layer w0.6: U1.5 47.55,18.085 C16.1 47.763,18.098 48.213,17.648 TP14.1@52.293,17.648
NetC17_1: C17.1 R5.2 R14.1 TP3.1 U1.16 | length 9.9
  Bottom Layer w0.6: C17.1 36.804,24.279 36.804,23.211 37.187,22.828 37.187,22.578 R14.1 ; R5.2 R14.1@37.362,22.653 ; R14.1@37.362,22.615 R14.1@37.362,22.653 ; TP3.1 39.181,23.216 39.232,23.165 37.912,23.165 37.575,22.828 37.537,22.828 R14.1@37.362,22.653
NetC18_1: C18.1 C19.2 R16.2 R19.2 TP15.1 U1.13 U1.14 | length 41.1
  Top Layer w0.6: TP15.1 30.799,27.508 34.813,27.508 40.705,33.401 43.068,33.401 v2@44.274,32.195
  Bottom Layer w0.6: TP15.1@29.352,26.06 29.352,19.38 30.688,18.044 33.365,18.044 C19.2 ; C19.2 35.546,18.043 35.646,18.143 35.646,19.003 35.997,19.355 U1.13 U1.14 ; R16.2 44.282,29.393 44.282,32.126 v2(44.312,32.156)
NetC21_2: C21.2 Q2.3 Q4.3 R22.2 R23.2 TP18.1 | length 50.2
  Top Layer w1: v1(24.5,35.625) v1(45.975,35.625) 45.986,35.636 50.014,35.636 56.707,28.943 TP18.1
  Bottom Layer w0.6: TP18.1 TP18.1@56.717,26.787 ; R23.2@56.717,22.767 R23.2@56.727,22.757 ; R23.2@59.169,22.749 R23.2@59.177,22.757
  Bottom Layer w1: v1(24.5,35.625) 24.5,37.102 Q2.3 ; v1(45.975,35.625) Q4.3@45.975,37.305 ; R22.2@54.803,22.749 56.717,22.749 R23.2@59.169,22.749 ; R22.2@54.863,22.828 C21.2 ; R23.2@56.717,22.767 TP18.1@56.717,26.787
NetC22_2: C22.2 R22.1 TP17.1 U1.1 | length 24.5
  Bottom Layer w0.6: U1.1 45.564,23.165 46.326,23.927 50.027,23.927 53.186,20.768 R22.1
  Bottom Layer w1: 54.803,20.028 60.149,20.028 61.254,21.133 61.254,25.219 59.781,26.693 TP17.1
NetC23_1: C23.1 C26.2 DD2.1 L3.2 | length 20.9
  Top Layer w1: L3.2@57.317,64.338 L3.2 57.292,62.063 58.292,61.063 64.65,61.063 65.15,60.563 C23.1 65.325,58.25 C26.2 67.175,55.43 69.73,52.875 69.73,52.375 DD2.1@69.83,52.275
NetD1_1: D1.1 D3.2 T1.7 | length 19
  Top Layer w1: T1.7 34.899,64.32 34.899,58.918 v1(34.914,58.903)
  Bottom Layer w1: D1.1 23.967,58.628 26.359,56.236 30.414,56.236 32.73,58.552 D3.2 32.755,58.877 34.889,58.877 v1(34.914,58.903)
NetD2_1: D2.1 D4.2 T1.5 | length 17.5
  Top Layer w1: T1.5 43.724,63.585 44.224,63.085 44.974,63.085 46.49,61.57 v1(48.808,61.57)
  Bottom Layer w1: D4.2 46.395,59.152 48.808,61.565 v1(48.808,61.57) 48.86,61.621 52.181,61.621 54.625,59.177 D2.1
NetD5_2: D5.2 D9.1 T1.8 | length 18
  Top Layer w1: v1(26.202,61.595) 26.254,61.543 29.082,61.543 31.124,63.585 T1.8
  Bottom Layer w1: D9.1 19.725,59.228 22.143,61.646 26.151,61.646 26.254,61.543 26.254,61.386 28.463,59.177 D5.2
NetD6_2: D6.2 R1.2 | length 2
  Top Layer w1: R1.2 7.086,20.044 D6.2@8.751,20.044 ; D6.2@8.726,20.019 D6.2@8.751,20.044 ; D6.2 8.93,20.044 D6.2@8.751,20.044
NetD7_2: D7.2 D10.1 T1.6 | length 18.6
  Top Layer w1: T1.6 39.979,64.32 39.979,58.969 v1(39.994,58.953)
  Bottom Layer w1: v1(39.994,58.953) 40.032,58.915 42.09,58.915 42.828,58.177 42.828,57.669 44.261,56.236 48.3,56.236 49.683,57.618 49.683,58.152 D10.1
NetD8_2: D8.2 R2.2 | length 2.3
  Top Layer w1: R2.2 D8.2@69.304,20.845
NetD13_2: D13.2 R24.2 | length 2.1
  Top Layer w1: D13.2 54.611,10.545 54.611,12.645 R24.2
NetQ1_1: Q1.1 Q5.1 R9.1 R15.2 TP7.1 | length 9.1
  Bottom Layer w0.6: R9.1@25.931,31.074 25.931,32.377 R15.2 27.676,32.385 27.687,32.375 Q5.1 28.546,32.375 28.571,32.349 Q1.1@31.717,32.349 ; TP7.1 31.717,30.381 Q1.1@31.717,32.349 ; Q1.1 Q1.1@31.717,32.349
NetQ1_2: Q1.2 Q5.2 R10.1 | length 5.1
  Bottom Layer w0.6: Q5.2 31.594,34.275 31.62,34.249 Q1.2@31.717,34.249 ; R10.1 31.717,35.7 Q1.2@31.717,34.249 ; Q1.2 Q1.2@31.717,34.249
NetQ2_1: Q2.1 R10.2 TP9.1 | length 5.1
  Bottom Layer w1: Q2.1 29.684,37.686 TP9.1@33.982,37.686
NetQ3_1: Q3.1 Q6.1 R11.1 R21.2 TP12.1 | length 10.2
  Bottom Layer w0.6: R21.2 Q6.1 ; Q6.1 Q6.1@49.623,32.73 ; R11.1 49.63,32.723 Q6.1@49.623,32.73 ; TP12.1 52.961,29.375 Q3.1@52.961,32.746 ; Q3.1 Q3.1@52.961,32.746 ; Q6.1@49.623,32.73 52.884,32.73 52.899,32.746 Q3.1@52.961,32.746
NetQ3_2: Q3.2 Q6.2 R12.1 | length 5
  Bottom Layer w0.6: Q6.2 50.029,34.63 50.045,34.646 Q3.2@52.974,34.646 ; R12.1 Q3.2@52.974,34.646 ; Q3.2 Q3.2@52.974,34.646
NetQ4_1: Q4.1 R12.2 TP11.1 | length 5.2
  Bottom Layer w1: Q4.1 50.525,37.805 50.981,38.262 R12.2 53.024,38.313 53.024,40.284 TP11.1
NetR7_1: R7.1 U1.8 U1.11 | length 10.6
  Bottom Layer w0.6: U1.11 41.569,16.815 42.28,16.104 42.28,14.275 ; R7.1 40.169,12.697 40.702,12.697 42.28,14.275 ; U1.8 42.28,14.275
NetR9_2: R9.2 U1.9 | length 25.4
  Bottom Layer w0.4: R9.2 25.922,21.128 30.007,17.043 33.495,17.043 34.025,16.513 34.025,15.138 34.889,14.275 U1.9
NetR11_2: R11.2 U1.10 | length 21.9
  Top Layer w0.6: v2(41.036,15.545) 41.036,18.491 42.585,20.041 44.211,20.041 48.5,24.33 v2(48.5,31.175)
  Bottom Layer w0.6: U1.10 v2(41.036,15.545) ; R11.2 47.635,31.17 48.495,31.17 v2(48.5,31.175)
NetR13_1: R13.1 TP10.1 U1.6 | length 8.5
  Top Layer w0.5: TP10.1 46.075,15.098 v4(46.075,16.8)
  Bottom Layer w0.5: U1.6 45.147,16.807 46.068,16.807 v4(46.075,16.8)
  Bottom Layer w1: TP10.1 R13.1@45.09,12.268
NetR20_2: R20.2 U1.4 | length 4.8
  Bottom Layer w0.6: U1.4 48.579,19.355 49.182,18.752 49.522,18.752 R20.2@49.672,18.602
VCC: C11.2 C12.1 L1.2 P1.8 P1.9 Q1.3 Q3.3 R3.1 R4.2 R5.1 R7.2 T1.2 T1.3 TP1.1 VD1.2 | length 155.9
  Top Layer w0.5: 32.349,19.406 v2(32.349,20.65)
  Top Layer w1: L1.2 23.773,21.414 26.048,21.414 28.056,19.406 32.349,19.406 38.318,19.406 41.333,22.421 43.076,22.421 C12.1@43.576,22.921 ; 37.353,43.264 37.424,43.335 ; P1.9 P1.8 41.31,6.385 48.01,13.085 48.01,22.312 v1(51.046,25.349) ; v1(40.197,30.099) 40.265,30.031 40.265,28.985 43.076,26.174 43.076,25.421 43.107,25.39 C12.1@43.576,25.39 ; C12.1@44.076,22.421 C12.1@43.576,22.921 ; v1(47.015,25.39) 44.076,25.39 43.576,24.89 43.576,24.748 C12.1 C12.1@43.576,22.921
  Top Layer w2: T1.2 37.424,43.335 T1.3 ; TP1.1 37.353,43.264
  Bottom Layer w0.6: v2@32.374,20.676 R5.1@35.387,20.676
  Bottom Layer w1: R3.1 29.793,48.032 37.201,40.624 ; Q1.3 34.432,33.299 ; C11.2 34.432,33.299 ; 37.353,40.428 45.211,48.286 R4.2 49.494,46.838 50.281,46.05 52.999,46.05 55.463,43.586 55.463,37.44 55.019,36.996 Q3.3 ; P1.9 P1.8 41.31,6.228 39.969,7.569 R7.2 ; v1(40.197,30.099) 40.197,32.441 37.327,35.311 35.316,33.299 34.432,33.299 ; v1(47.015,25.39) 47.035,25.37 51.026,25.37 v1(51.046,25.349)
  Bottom Layer w2: VD1.2@37.353,35.636 TP1.1 37.353,40.428
pads on no net: P1.5 P1.6 P1.7 P1.12 P1.13 P1.14

## Polygon pours and split planes (outlines as drawn)
GND on Top Layer "NONET_L-01_P-001" (solid, pour order 1): 46.225,8.925 42.75,5.45 42.75,2.275 32.525,2.275 32.525,2.825 32.525,4.975 29,8.5 22.825,8.5 14.6,16.725 14.6,48.275 16.225,49.9 58.425,49.9 59.8,48.525 59.8,29.35 61.575,27.575 61.575,12.325 58.175,8.925
GND on Bottom Layer "NONET_L-01_P-001" (solid, pour order 0): 46.225,8.925 42.75,5.45 42.75,2.275 32.525,2.275 32.525,2.825 32.525,4.975 29,8.5 22.825,8.5 14.6,16.725 14.6,48.275 16.25,49.925 58.4,49.925 59.8,48.525 59.8,29.35 62.475,26.675 62.475,13.3 58.1,8.925

## Keep-outs
Keep-Out Layer:
  circle w0.254: c5,75 r1.5
  circle w0.254: c70,75 r1.5
  circle w0.254: c70,5 r1.5
  circle w0.254: c5,5 r1.5
  lines w0.254: -2.5,55.118 -2.475,55.093 ; 5,0 cw(c5,5) 0,5 0,75 cw(c5,75) 5,80 70,80 cw(c70,75) 75,75 75,5 cw(c70,5) 70,0 5.025,0 ; 36.5,57 ccw(c37.5,57) 38.5,57 38.5,70 ccw(c37.5,70) 36.5,70 36.5,57

## Other copper
Bottom Layer:
  rectangle net NetC22_2: 54.167,18.872 55.437,21.184

## Silkscreen, mask and mechanical layers (free items; w line width, h text height)
Top Overlay:
  circle w1: c5,5 r2
  circle w1: c5,75 r2
  circle w1: c70,5 r2
  circle w1: c70,75 r2
  lines w0.254: 35.5,67.691 35.5,79.731 ; 39.5,67.691 39.5,79.707
  text "GND2" at 23.891,6.401 h0.8 r90
  text "VCC2" at 18.802,6.316 h0.8 r90
  text "GND2" at 21.351,6.299 h0.8 r90
  text "VCC1" at 57.105,6.24 h0.8 r90
  text "VCC2" at 16.271,6.223 h0.8 r90
  text "VCC1" at 59.705,6.223 h0.8 r90
  text "GND1" at 54.548,6.172 h0.8 r90
  text "GND1" at 52.008,6.147 h0.8 r90
  text "VCC" at 41.671,6.096 h0.8 r90
  text "GND" at 36.565,5.994 h0.8 r90
  text "VCC" at 39.502,5.984 h0.8 r90
  text "GND" at 34.051,5.918 h0.8 r90
Bottom Overlay:
  circle w1: c70,75 r2
  circle w1: c5,5 r2
  circle w1: c70,5 r2
  circle w1: c5,75 r2
  text "GND2" at 23.891,9.22 h0.8 r90
  text "VCC2" at 18.802,9.136 h0.8 r90
  text "GND2" at 21.351,9.119 h0.8 r90
  text "VCC2" at 16.271,9.042 h0.8 r90
  text "VCC1" at 57.08,8.856 h0.8 r90
  text "VCC1" at 59.679,8.839 h0.8 r90
  text "GND1" at 54.523,8.788 h0.8 r90
  text "GND1" at 51.983,8.763 h0.8 r90
  text "VCC" at 41.671,8.103 h0.8 r90
  text "GND" at 36.565,8.001 h0.8 r90
  text "VCC" at 39.502,7.99 h0.8 r90
  text "GND" at 34.051,7.925 h0.8 r90
Top 3D Body:
  region: 49.387,3.185 49.524,3.094 49.615,2.958 49.647,2.797 49.639,1.972 49.647,1.972 49.615,1.811 49.524,1.674 49.387,1.583 49.226,1.551 48.401,1.559 48.401,1.551 48.24,1.583 48.104,1.674 48.013,1.811 47.981,1.972 47.989,2.797 47.981,2.797 48.013,2.958 48.104,3.094 48.24,3.185 48.401,3.217 48.401,3.209 49.226,3.209 49.226,3.217
Bottom 3D Body:
  circle w0.013: c38.654,2.384 r0.825
  circle w0.013: c36.114,2.384 r0.825
  circle w0.013: c41.194,2.384 r0.825
  circle w0.013: c33.574,2.384 r0.825
  circle w0.013: c43.734,2.384 r0.825
  circle w0.013: c10.714,2.384 r0.825
  circle w0.013: c8.174,2.384 r0.825
  circle w0.013: c5.634,2.384 r0.825
  circle w0.013: c46.274,2.384 r0.825
  circle w0.013: c18.334,2.384 r0.825
  circle w0.013: c20.874,2.384 r0.825
  circle w0.013: c28.494,2.384 r0.825
  circle w0.013: c13.254,2.384 r0.825
  circle w0.013: c25.954,2.384 r0.825
  circle w0.013: c23.414,2.384 r0.825
  circle w0.013: c31.034,2.384 r0.825
  circle w0.013: c15.794,2.384 r0.825
  circle w0.013: c13.254,2.384 r0.825
  circle w0.013: c15.794,2.384 r0.825
  circle w0.013: c18.334,2.384 r0.825
  circle w0.013: c20.874,2.384 r0.825
  circle w0.013: c23.414,2.384 r0.825
  circle w0.013: c25.954,2.384 r0.825
  circle w0.013: c28.494,2.384 r0.825
  circle w0.013: c31.034,2.384 r0.825
  circle w0.013: c33.574,2.384 r0.825
  circle w0.013: c43.734,2.384 r0.825
  circle w0.013: c46.274,2.384 r0.825
  circle w0.013: c41.194,2.384 r0.825
  circle w0.013: c38.654,2.384 r0.825
  circle w0.013: c36.114,2.384 r0.825
  circle w0.013: c10.714,2.384 r0.825
  circle w0.013: c8.174,2.384 r0.825
  circle w0.013: c5.634,2.384 r0.825
  region: 49.387,3.185 49.524,3.094 49.615,2.958 49.647,2.797 49.639,1.972 49.647,1.972 49.615,1.811 49.524,1.674 49.387,1.583 49.226,1.551 48.401,1.559 48.401,1.551 48.24,1.583 48.104,1.674 48.013,1.811 47.981,1.972 47.989,2.797 47.981,2.797 48.013,2.958 48.104,3.094 48.24,3.185 48.401,3.217 48.401,3.209 49.226,3.209 49.226,3.217
Top Assembly:
  lines w0.013: -2.5,-0.009 -2.5,54.991 57.5,54.991 57.5,-0.009 -2.5,-0.009
Bottom Assembly:
  circle w0.013: c13.254,2.384 r0.825
  circle w0.013: c15.794,2.384 r0.825
  circle w0.013: c18.334,2.384 r0.825
  circle w0.013: c20.874,2.384 r0.825
  circle w0.013: c23.414,2.384 r0.825
  circle w0.013: c25.954,2.384 r0.825
  circle w0.013: c28.494,2.384 r0.825
  circle w0.013: c31.034,2.384 r0.825
  circle w0.013: c33.574,2.384 r0.825
  circle w0.013: c43.734,2.384 r0.825
  circle w0.013: c46.274,2.384 r0.825
  circle w0.013: c41.194,2.384 r0.825
  circle w0.013: c38.654,2.384 r0.825
  circle w0.013: c36.114,2.384 r0.825
  circle w0.013: c10.714,2.384 r0.825
  circle w0.013: c8.174,2.384 r0.825
  circle w0.013: c5.634,2.384 r0.825
  region: 49.387,3.185 49.524,3.094 49.615,2.958 49.647,2.797 49.639,1.972 49.647,1.972 49.615,1.811 49.524,1.674 49.387,1.583 49.226,1.551 48.401,1.559 48.401,1.551 48.24,1.583 48.104,1.674 48.013,1.811 47.981,1.972 47.989,2.797 47.981,2.797 48.013,2.958 48.104,3.094 48.24,3.185 48.401,3.217 48.401,3.209 49.226,3.209 49.226,3.217

## Text inside footprints (layer, text, board x,y; h text height)
P1: Top Overlay "18" at 13.04,3.4 h1.02